# Altium PCB MB_v3.PcbDoc (part 8 of 11)
Units mm, origin at the board's own origin, x right, y up, seen from the top; angles counter-clockwise.
Board outline 203 x 72 mm, 6 copper layers (Top Layer, Layer 3, Layer 1, Layer 2, Layer 4, Bottom Layer), stack 1.52 mm thick; 726 components, 608 nets, 3144 pads, 2508 vias.
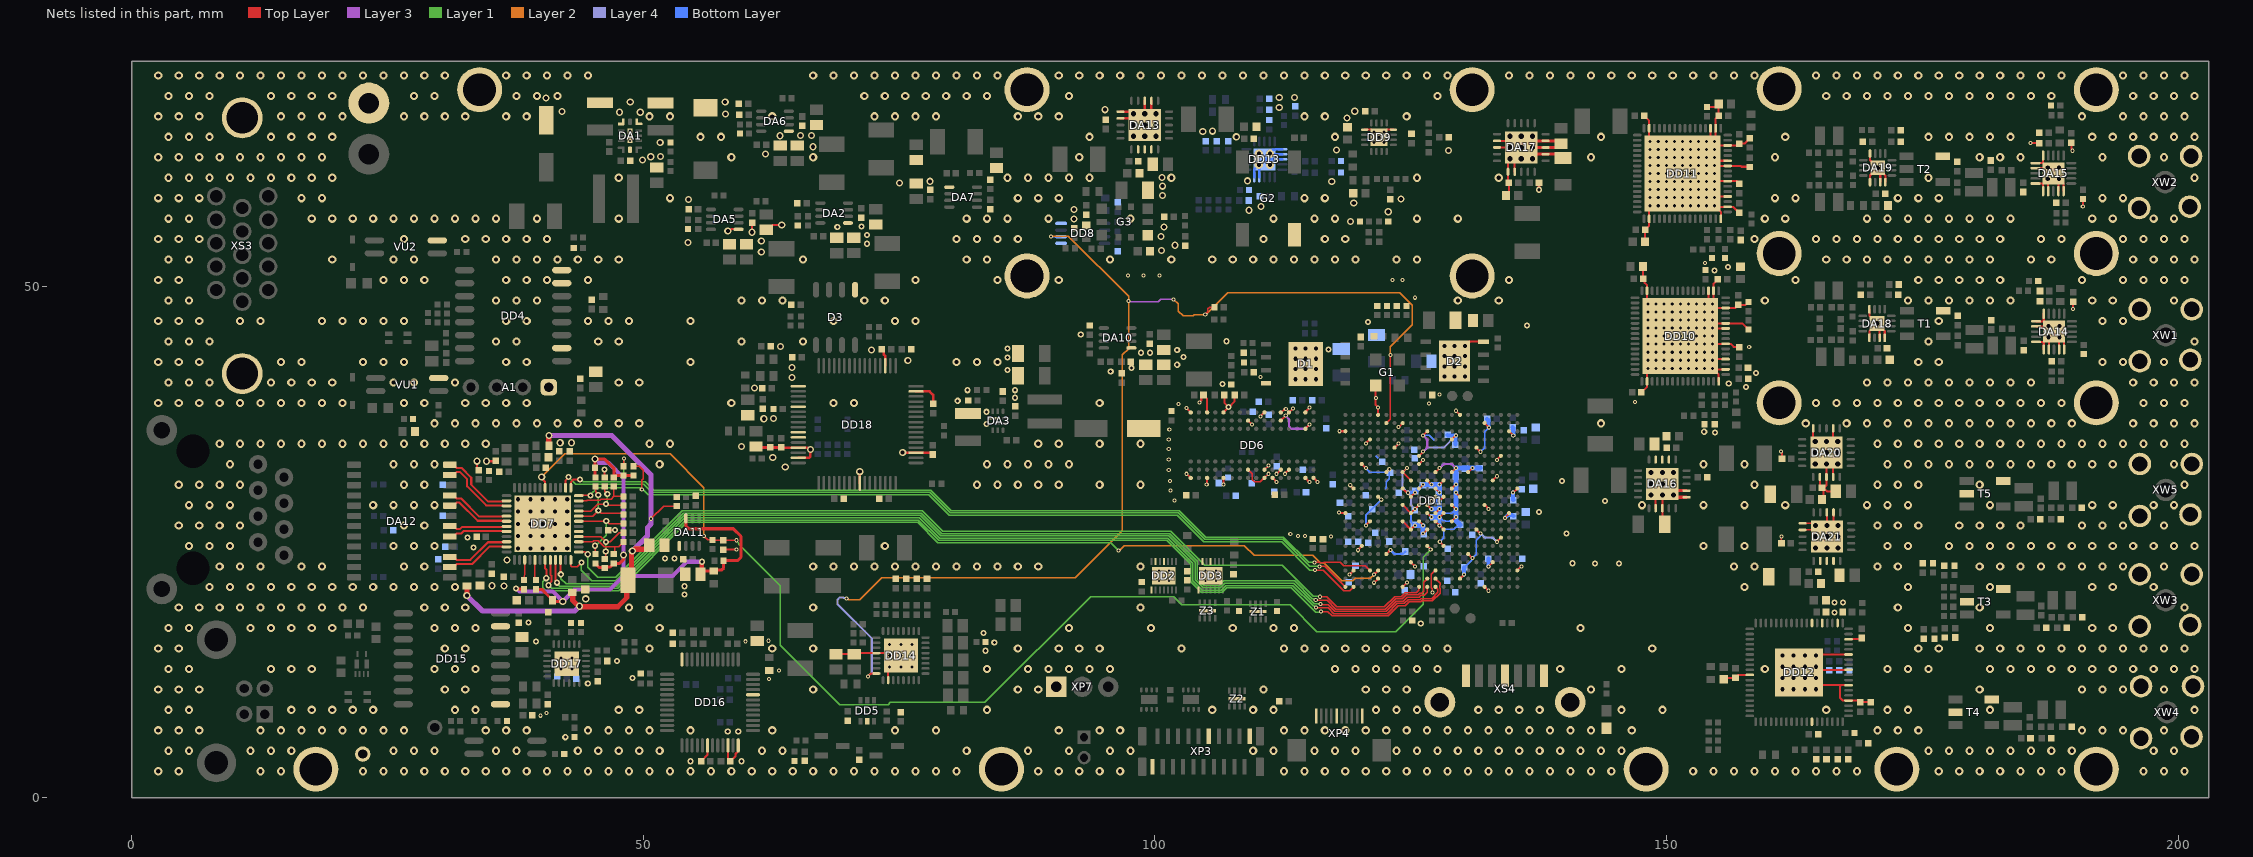
[diagram p10: the nets of this part, all layers, seen from the top]

## Via types
v1: diameter 0.8, hole 0.4, Top Layer to Bottom Layer, tented both sides, 1056 vias
v2: diameter 0.4, hole 0.2, Top Layer to Bottom Layer, tented both sides, 707 vias
v3: diameter 0.6, hole 0.3, Top Layer to Bottom Layer, tented both sides, 364 vias
v4: diameter 0.7, hole 0.4, Top Layer to Bottom Layer, tented both sides, 223 vias
v5: diameter 0.8, hole 0.4, Top Layer to Bottom Layer, 52 vias
v6: diameter 0.9, hole 0.5, Top Layer to Bottom Layer, 45 vias
v7: diameter 0.66, hole 0.4, Top Layer to Bottom Layer, 25 vias
v8: diameter 0.7, hole 0.3, Top Layer to Bottom Layer, 13 vias
v9: diameter 0.5, hole 0.2, Top Layer to Bottom Layer, 12 vias
v10: diameter 0.5, hole 0.3, Top Layer to Bottom Layer, 5 vias
v11: diameter 1, hole 0.5, Top Layer to Bottom Layer, 2 vias
v12: diameter 0.4, hole 0.2, Top Layer to Bottom Layer, 2 vias
v13: diameter 0.9, hole 0.4, Top Layer to Bottom Layer, tented both sides, 2 vias

## Nets (pads, with @x,y where several pads share a name; then routed paths per layer and width w, separated by ;. In a path a pad name is that pad's centre, name@x,y a point inside that pad or via, vN(x,y) a via of type N, cw(c..) or ccw(c..) an arc to the next point about the centre after c; other vN are vias at no path point) (continued)
ETH0_1V2: C131.2 L16.2 L19.1 L20.1 L21.1 R63.2 | length 50
  Top Layer w0.125: v2(50.75,27.275) 51.981,28.506 R63.2@53.271,28.506
  Top Layer w0.5: v4(32.75,19.775) 32.758,19.783 32.758,20.698 L20.1@32.766,20.706 ; L21.1@40.762,34.417 40.762,35.387 v4(40.775,35.4) ; L19.1@43.053,20.071 43.104,20.02 43.104,19.296 43.725,18.675 47.5,18.675 48.385,19.56 48.385,21.155 48.848,21.618 48.848,23.994 48.925,24.071 v4(48.925,24.125) 48.979,24.125 49.15,24.296 50.32,24.296 50.57,24.546 C131.2@50.57,24.696
  Layer 3 w0.5: v4(32.75,19.775) 34.275,18.25 43.3,18.25 v4(43.773,18.723) ; v4(40.775,35.4) 46.925,35.4 50.75,31.575 v2(50.75,27.275) 50.75,26.753 50.4,26.403 50.4,25.6 v4(48.925,24.125)
ETH0_3V3: C146.2 DA11.7 L17.2 L18.1 R62.2 R71.2 R72.2 R73.2 R74.2 R75.2 R77.2 R78.2 R79.2 R81.1 R83.1 | length 63.1
  Top Layer w0.3: v3(37.55,20.45) 37.586,20.414 38.318,20.414 R83.1@38.354,20.378 ; R81.1@39.497,20.378 39.499,20.376 40.071,20.376 40.873,19.574 40.948,19.574 41.143,19.379 L18.1@41.143,19.304 41.247,19.2 v4(42.125,19.2) ; R72.2@45.339,22.918 45.325,22.904 45.325,22.825 45.432,22.825 45.489,22.768 45.489,22.702 45.665,22.526 46.149,22.526 R73.2@46.225,22.45 46.331,22.556 46.755,22.556 R74.2@47.117,22.918 47.693,22.918 48.05,23.275 v4(48.05,23.725) ; R71.2@45.339,31.311 45.281,31.369 R77.2@45.281,32.258 45.278,32.261 45.278,33.097 v4(45.275,33.1) 46.225,33.1 47.117,32.208 R75.2@47.117,31.311 47.306,31.5 R78.2@48.075,31.5 R79.2@49.025,31.5 ; DA11.7@54.158,27.316 54.158,26.567 54.425,26.3 58.8,26.3 59.55,25.55 59.55,23.525 59.2,23.175 R62.2@57.85,23.175 57.85,22.451 57.674,22.275 56.97,22.275 L17.2@56.875,22.18 55.93,22.18 55.712,21.962 C146.2@55.6,21.85
  Top Layer w0.4: C146.2@55.6,21.85 55.712,21.962 55.712,23.037 v3(55.75,23.075)
  Layer 3 w0.4: v3(37.55,20.45) 37.604,20.45 37.881,20.173 41.152,20.173 v4(42.125,19.2) 43.275,20.35 46.727,20.35 48.05,21.673 ; v4(45.275,33.1) 45.309,33.1 45.659,32.75 46.575,32.75 48.05,31.275 v4(48.05,23.725) 48.05,21.673 ; v3(55.75,23.075) 54.275,23.075 52.873,21.673 48.05,21.673
ETH0_LEDGRN: DD7.17 R81.2 | length 2
  Top Layer w0.125: DD7.17@39.413,23.252 39.413,21.362 R81.2@39.497,21.278
ETH0_LEDYEL: DD7.15 R83.2 | length 2
  Top Layer w0.125: R83.2@38.354,21.278 38.354,21.728 38.413,21.787 DD7.15@38.413,23.252
ETH0_TD0_N: DA12.11 DD7.3 | length 7.5
  Top Layer w0.2: DA12.11@31.091,31.551 31.466,31.551 31.766,31.851 32.066,31.851 32.783,31.134 32.783,30.444 34.65,28.577 36.236,28.577 36.286,28.527 DD7.3@36.638,28.527
ETH0_TD0_P: DA12.12 DD7.2 | length 7.5
  Top Layer w0.2: DA12.12@31.091,32.551 31.466,32.551 31.766,32.251 32.232,32.251 33.183,31.3 33.183,30.61 34.816,28.977 36.236,28.977 36.286,29.027 DD7.2@36.638,29.027
ETH0_TD1_N: DA12.8 DD7.6 | length 6.4
  Top Layer w0.2: DA12.8@31.091,28.551 31.466,28.551 31.766,28.851 32.04,28.851 33.814,27.077 36.236,27.077 36.286,27.027 DD7.6@36.638,27.027
ETH0_TD1_P: DA12.9 DD7.5 | length 6.4
  Top Layer w0.2: DA12.9@31.091,29.551 31.466,29.551 31.766,29.251 32.206,29.251 33.98,27.477 36.236,27.477 36.286,27.527 DD7.5@36.638,27.527
ETH0_TD2_N: DA12.5 DD7.8 | length 5.8
  Top Layer w0.2: DA12.5@31.091,25.551 31.466,25.551 31.766,25.851 32.232,25.851 32.458,26.077 35.181,26.077 36.236,26.077 36.286,26.027 DD7.8@36.638,26.027
ETH0_TD2_P: DA12.6 DD7.7 | length 5.8
  Top Layer w0.2: DA12.6@31.091,26.551 31.466,26.551 31.766,26.251 32.066,26.251 32.292,26.477 35.347,26.477 36.236,26.477 36.286,26.527 DD7.7@36.638,26.527
ETH0_TD3_N: DA12.2 DD7.11 | length 6.4
  Top Layer w0.2: DA12.2@31.091,22.551 31.466,22.551 31.766,22.851 33.265,22.851 34.991,24.577 36.236,24.577 36.286,24.527 DD7.11@36.638,24.527
ETH0_TD3_P: DA12.3 DD7.10 | length 6.4
  Top Layer w0.2: DA12.3@31.091,23.551 31.466,23.551 31.766,23.251 33.099,23.251 34.825,24.977 36.236,24.977 36.286,25.027 DD7.10@36.638,25.027
ETH_INT: DD1.AB1 DD7.38 | length 81.6
  Top Layer w0.125: v2(116.1,22.625) 116.612,22.625 DD1.AB1@118.612,20.625
  Top Layer w0.2: DD7.38@42.413,30.302 42.413,31.029 42.672,31.288 v3(42.672,31.369)
  Layer 1 w0.125: v3(42.672,31.369) 43.389,30.652 50.023,30.652 50.825,29.85 78.007,29.85 80.007,27.85 102.282,27.85 104.869,25.263 112.469,25.263 115.107,22.625 v2(116.1,22.625)
ETH_MDC: DD1.AB2 DD7.36 R79.1 | length 83.6
  Top Layer w0.125: DD7.36@43.688,29.527 43.72,29.559 44.822,29.559 v3(44.831,29.55) ; R79.1@49.025,32.4 49.6,32.4 50,32 50,31.175 49.85,31.025 v2(49.85,30.125) ; v2(115.65,22.262) 116.442,22.262 118.455,20.25 119.037,20.25 DD1.AB2@119.412,20.625
  Layer 1 w0.125: v3(44.831,29.55) 44.831,29.63 45.526,30.325 49.789,30.325 v2@49.92,30.195 ; v2(49.85,30.125) v2@49.92,30.195 ; v2(115.65,22.262) 115.151,22.262 112.376,25.038 104.776,25.038 102.189,27.625 79.914,27.625 77.914,29.625 50.489,29.625 v2@49.92,30.195
ETH_MDIO: DD1.Y4 DD7.37 R78.1 | length 85.5
  Top Layer w0.125: R78.1@48.075,32.4 48.075,33.125 v2(48.1,33.15) ; v2(115.575,23) 116.108,23 116.121,22.988 116.25,22.988 116.255,22.983 116.512,22.983 116.529,23 118.124,23 118.462,22.662 120.575,22.662 DD1.Y4@121.012,22.225
  Top Layer w0.2: DD7.37@42.913,30.302 42.921,30.31 42.921,30.856 43.18,31.115 v3(43.815,31.115)
  Layer 1 w0.125: v3(43.815,31.115) 43.911,31.115 44.126,30.9 48.1,30.9 ; v2(48.1,33.15) 48.1,30.9 ; v2(115.575,23) 115.05,23 112.562,25.488 104.962,25.488 102.375,28.075 80.1,28.075 78.1,30.075 51,30.075 50.175,30.9 48.1,30.9
ETH_RST: C155.2 DD1.U11 DD7.42 R70.1 | length 117.8
  Top Layer w0.125: v2(55.925,25.575) 56.285,25.215 R70.1@56.769,25.215 56.824,25.16 C155.2@57.825,25.16 59.085,25.16 v2(59.1,25.175)
  Top Layer w0.2: v4(40.069,31.369) 40.069,31.234 40.394,30.909 40.394,30.321 DD7.42@40.413,30.302 ; DD1.U11@126.612,24.625 126.612,24.619 126.95,24.281 v2(126.95,24.275)
  Layer 1 w0.125: v2(59.1,25.175) 59.1,25.113 59.343,24.87 59.343,24.782 63.375,20.75 63.375,14.925 69.195,9.105 73.915,9.105 74.135,9.325 83.389,9.325 93.726,19.663 101.838,19.663 102.624,18.876 113.205,18.876 115.827,16.253 123.553,16.253 126.22,18.92 126.22,23.509 126.95,24.238 v2(126.95,24.275)
  Layer 2 w0.125: v4(40.069,31.369) 42.312,33.613 52.637,33.613 55.925,30.325 v2(55.925,25.575)
ETH_RXC: DD7.35 R60.1 R75.1 | length 5.5
  Top Layer w0.125: DD7.35@43.688,29.027 44.467,29.027 44.502,29.063 45.754,29.063 45.881,29.19 46.843,29.19 47.117,29.464 ; R75.1@47.117,30.411 47.117,29.464 ; R60.1@48.064,29.464 47.117,29.464
ETH_RXCTL: DD7.33 R65.1 R76.1 | length 6.6
  Top Layer w0.125: DD7.33@43.688,28.027 44.864,28.027 45.539,28.702 46.484,28.702 46.611,28.575 R65.1@48.064,28.575 ; R76.1@46.228,30.411 46.228,29.97 46.482,29.716 v3(46.482,29.677)
  Layer 1 w0.125: v3(46.355,28.702) 46.355,28.831 46.482,28.958 v3(46.482,29.677)
ETH_RXD0: DD7.32 R66.2 R71.1 | length 7.2
  Top Layer w0.125: DD7.32@43.688,27.527 45.039,27.527 45.588,28.076 v3(45.602,28.076) ; R71.1@45.339,30.411 45.339,29.902 45.593,29.648 v3(45.593,29.591) ; v3@45.579,28.067 45.65,28.067 45.904,27.813 47.937,27.813 R66.2@48.064,27.686
  Layer 1 w0.125: v3(45.593,29.591) 45.597,29.587 45.597,28.08 v3(45.602,28.076)
ETH_RXD1: DD7.31 R67.2 R72.1 | length 8.2
  Top Layer w0.125: DD7.31@43.688,27.027 46.352,27.027 v3(46.375,27.05) 46.433,27.05 46.686,26.797 R67.2@48.064,26.797 ; v3(45.289,24.634) 45.289,23.868 R72.1@45.339,23.818
  Layer 1 w0.125: v3(45.289,24.634) 45.335,24.634 46.375,25.674 v3(46.375,27.05)
ETH_RXD2: DD7.28 R68.1 R73.1 | length 6.5
  Top Layer w0.125: DD7.28@43.688,25.527 45.856,25.527 v3(46.369,25.014) 46.389,25.034 46.784,25.034 47.65,25.9 48.056,25.9 R68.1@48.064,25.908 ; R73.1@46.228,23.564 46.304,23.564 46.328,23.587 v3(46.328,24.089)
  Layer 1 w0.125: v3(46.328,24.089) 46.348,24.11 46.348,24.993 v3(46.369,25.014)
ETH_RXD3: DD7.27 R69.1 R74.1 | length 5.6
  Top Layer w0.125: DD7.27@43.688,25.027 45.039,25.027 45.137,25.126 45.604,25.126 46.178,24.552 47.227,24.552 ; R74.1@47.117,23.818 47.227,23.928 47.227,24.552 ; R69.1@48.064,25.019 47.597,24.552 47.227,24.552
ETH_TXC: DD1.AA11 DD7.24 | length 95.3
  Top Layer w0.125: DD7.24@42.913,23.252 42.913,22.679 42.986,22.606 43.561,22.606 v3(43.942,22.987) ; v2(115.712,19.342) 115.765,19.289 116.829,19.289 117.668,18.45 122.51,18.45 123.51,19.45 124.186,19.45 124.561,19.825 125.714,19.825 125.901,20.012 126.062,20.012 126.249,20.199 126.249,21.062 DD1.AA11@126.612,21.425
  Layer 1 w0.125: v3(43.942,22.987) 43.942,22.258 44.975,21.225 47.284,21.225 53.884,27.825 77.168,27.825 79.168,25.825 101.443,25.825 104.15,23.118 104.15,21.411 104.811,20.75 106.277,20.75 106.727,21.2 113.66,21.2 115.38,19.479 115.5,19.479 115.638,19.342 v2(115.712,19.342)
ETH_TXCTL: DD1.AB10 DD7.25 | length 91.4
  Top Layer w0.125: DD7.25@43.688,24.027 44.279,24.027 44.503,23.804 v3(44.572,23.804) ; v2(116.135,19.652) 116.146,19.64 116.796,19.64 117.761,18.675 122.417,18.675 123.417,19.675 124.093,19.675 124.468,20.05 125.525,20.05 125.759,20.284 125.759,20.572 DD1.AB10@125.812,20.625
  Layer 1 w0.125: v3(44.572,23.804) 44.572,22.553 45.55,21.575 47.316,21.575 53.791,28.05 77.261,28.05 79.261,26.05 101.536,26.05 104.862,22.724 112.454,22.724 115.473,19.704 115.862,19.704 115.876,19.691 116.095,19.691 v2(116.135,19.652)
ETH_TXD0: DD1.Y5 DD7.19 | length 90.6
  Top Layer w0.2: DD7.19@40.413,23.252 40.413,22.432 40.53,22.315 40.53,21.48 v3(40.513,21.463) ; v2(121.411,21.824) DD1.Y5@121.812,22.225
  Layer 1 w0.125: v3(40.513,21.463) 40.15,21.1 40.15,20.55 40.45,20.25 47.582,20.25 54.257,26.925 76.795,26.925 78.795,24.925 95.685,24.925 v2(96.441,24.169)
  Layer 2 w0.125: v2(96.441,24.169) 96.515,24.169 96.996,24.65 108.739,24.65 109.69,23.699 115.426,23.699 116.137,22.988 116.513,22.988 118.264,21.236 119.351,21.236 119.565,21.45 121.037,21.45 v2(121.411,21.824)
ETH_TXD1: DD1.AA12 DD7.20 | length 100.5
  Top Layer w0.125: v2(116.227,18.201) 116.899,18.201 117.325,17.775 122.789,17.775 123.789,18.775 124.466,18.775 124.841,19.15 125.993,19.15 126.093,19.25 127.121,19.25 127.861,19.991 127.861,20.482 127.85,20.494 127.85,20.775 127.861,20.787 127.861,20.976 DD1.AA12@127.412,21.425
  Top Layer w0.2: v3(40.746,20.773) 40.746,20.881 41.038,21.173 41.038,21.68 40.913,21.805 DD7.20@40.913,23.252
  Layer 1 w0.125: v3(40.746,20.773) 41.044,20.475 47.489,20.475 54.164,27.15 76.888,27.15 78.888,25.15 101.163,25.15 103.475,22.838 103.475,21.131 104.531,20.075 106.557,20.075 107.007,20.525 113.329,20.525 115.706,18.148 115.902,18.148 116.175,18.148 v2(116.227,18.201)
ETH_TXD2: DD1.AB12 DD7.21 | length 98
  Top Layer w0.125: v2(115.75,18.617) 115.803,18.564 115.96,18.564 115.961,18.563 116.919,18.563 117.482,18 122.696,18 123.696,19 124.372,19 124.747,19.375 125.9,19.375 126,19.475 127.028,19.475 127.636,20.084 127.636,20.401 DD1.AB12@127.412,20.625
  Top Layer w0.2: DD7.21@41.413,23.252 41.413,21.243 41.552,21.103 v3(41.552,21.026)
  Layer 1 w0.125: v3(41.552,21.026) 41.552,20.995 41.847,20.7 47.396,20.7 54.071,27.375 76.982,27.375 78.982,25.375 101.257,25.375 103.7,22.932 103.7,21.224 104.624,20.3 106.464,20.3 106.914,20.75 113.473,20.75 115.469,18.754 115.539,18.754 115.677,18.617 v2(115.75,18.617)
ETH_TXD3: DD1.AB11 DD7.22 | length 96
  Top Layer w0.125: v2(116.183,18.926) 116.234,18.875 116.925,18.875 117.575,18.225 122.603,18.225 123.603,19.225 124.279,19.225 124.654,19.6 125.807,19.6 125.994,19.787 126.314,19.787 126.612,20.085 DD1.AB11@126.612,20.625
  Top Layer w0.2: DD7.22@41.913,23.252 41.913,21.869 v3(41.938,21.844)
  Layer 1 w0.125: v3(41.938,21.844) 41.945,21.837 41.945,21.43 42.45,20.925 47.302,20.925 53.977,27.6 77.075,27.6 79.075,25.6 101.35,25.6 103.925,23.025 103.925,21.317 104.717,20.525 106.37,20.525 106.82,20.975 113.567,20.975 115.562,18.979 115.9,18.979 115.901,18.978 116.13,18.978 v2(116.183,18.926)
GND: A1.1 C1.1 C2.2 C3.1 C4.1 C5.2 C6.1 C7.1 C8.1 C9.1 C10.1 C11.1 C12.1 C15.1 C16.1 C17.1 C18.1 C19.1 C21.1 C22.1 C23.1 C25.2 C26.2 C30.1 C32.1 C33.1 C34.1 C35.1 C36.1 C37.2 C38.1 C39.1 C40.1 C41.1 C42.1 C43.1 C44.1 C45.1 C46.1 C47.1 C48.1 C49.1 C50.1 C51.1 C52.1 C53.1 C54.2 C55.1 C56.1 C57.1 C58.1 C59.1 C60.1 C61.1 C62.1 C63.1 C64.1 C65.1 C66.1 C67.1 C68.1 C69.1 C70.2 C71.1 C72.1 C73.1 C74.1 C75.1 C76.1 C77.1 C78.1 C79.1 C80.1 C81.1 C84.1 C85.1 C86.1 C87.1 C88.1 C89.1 C91.1 C92.1 C93.1 C94.1 C95.1 C96.1 C97.1 C98.1 C99.1 C100.1 C101.1 C102.1 C103.1 C104.1 C105.1 C106.1 C107.1 C108.1 C109.1 C110.1 C111.1 C112.1 C113.1 C114.1 C115.1 C116.1 C117.1 C118.1 C119.1 C120.1 C121.1 C122.2 C123.1 C124.1 C125.1 C126.1 C127.2 C128.1 C129.1 C131.1 C132.1 C133.1 C134.1 C135.1 C136.1 C137.1 C138.1 C139.1 C140.1 C141.1 C142.1 C143.1 C144.1 C145.1 C146.1 C147.1 C148.1 C149.1 C150.1 C151.1 C152.1 C153.1 C154.1 C155.1 C156.1 C157.1 C158.1 C159.1 C160.1 C161.1 C162.1 C163.1 C164.1 C165.1 C166.1 C167.1 C168.1 C169.1 C170.1 C171.1 C172.1 C173.2 C174.1 C175.1 C176.1 C177.1 C178.1 C179.1 C180.1 C181.2 C182.1 C183.1 C184.1 C185.1 C186.1 C187.1 C188.1 C189.1 C191.1 C192.1 C193.1 C194.1 C195.2 C196.1 C197.2 C198.1 C199.1 C200.1 C202.1 C203.1 C204.1 C205.1 C208.1 C209.2 C210.1 C211.1 C212.1 C215.1 C216.1 C217.1 C218.1 C219.1 C220.1 C221.1 C222.1 C223.1 C224.1 C225.1 C226.1 C227.1 C228.1 C229.1 C230.1 C231.1 C232.1 C233.1 C234.1 C235.1 C236.1 C237.1 C242.1 C245.1 C247.1 C251.1 C252.1 C254.1 C255.1 C256.1 C257.1 C258.1 C259.1 C260.1 C261.1 C262.1 C263.1 C264.1 C265.1 C266.1 C267.1 C269.1 C270.1 C271.1 C272.1 C273.1 C274.1 C275.1 C276.1 C277.1 C278.1 C279.1 C280.1 C281.1 C282.1 C283.1 C284.1 C285.1 C286.1 C287.1 C288.1 C289.1 C290.1 C291.1 C292.1 C293.1 C294.1 C295.1 C296.1 C297.2 C298.1 C299.2 C300.2 C301.1 C302.2 C303.1 C305.1 C306.1 C308.1 C309.1 C310.1 C311.1 C314.1 C316.1 C317.1 C320.1 C321.1 C322.1 C323.2 C324.2 C325.1 C326.2 C327.1 C328.1 C329.1 C330.1 C333.1 C335.1 C336.1 C337.2 C338.2 C339.1 C340.1 C343.1 C346.1 C347.2 C348.2 C352.2 C359.1 C360.1 C361.1 C363.1 C364.1 D1.4 D1.9 D2.4 D2.9 D3.5 DA1.1 DA1.6 DA1.11 DA1.13 DA2.1 DA3.4 DA5.1 DA6.1 DA7.1 DA10.1 DA11.1 DA13.7 DA13.8 DA13.11 DA13.12 DA13.17 DA13.18 DA13.19 DA13.21 DA14.10 DA14.11 DA14.12 DA14.15 DA14.16 DA14.17 DA14.19 DA14.20 DA14.21 DA15.10 DA15.11 DA15.12 DA15.15 DA15.16 DA15.17 DA15.19 DA15.20 DA15.21 DA16.7 DA16.8 DA16.11 DA16.12 DA16.17 DA16.18 DA16.19 DA16.21 DA17.7 DA17.8 DA17.11 DA17.12 DA17.17 DA17.18 DA17.19 DA17.21 DA18.4 DA18.9 DA18.11 DA18.12 DA18.17 DA19.4 DA19.9 DA19.11 DA19.12 DA19.17 DA20.7 DA20.10 DA20.17 DA20.18 DA20.19 DA20.21 DA21.7 DA21.8 DA21.11 DA21.12 DA21.17 DA21.18 DA21.19 DA21.21 DD1.A5 DD1.A15 DD1.AA5 DD1.AA15 DD1.AB8 DD1.AB18 DD1.B8 DD1.B18 DD1.C1 DD1.C11 DD1.C21 DD1.D4 DD1.D14 DD1.E7 DD1.E17 DD1.F10 DD1.F20 DD1.G3 DD1.G10 DD1.H6 DD1.H8 DD1.H12 DD1.H14 DD1.H16 DD1.J9 DD1.J11 DD1.J13 DD1.J19 DD1.K2 DD1.K8 DD1.K10 DD1.K12 DD1.K14 DD1.K22 DD1.L5 DD1.L9 DD1.L12 DD1.L13 DD1.L15 DD1.M8 DD1.M10 DD1.M11 DD1.M14 DD1.M18 DD1.N1 DD1.N9 DD1.N11 DD1.N12 DD1.N13 DD1.N21 DD1.P4 DD1.P8 DD1.P10 DD1.P12 DD1.P14 DD1.R9 DD1.R11 DD1.R13 DD1.R17 DD1.T20 DD1.U3 DD1.U13 DD1.V6 DD1.V16 DD1.W9 DD1.W19 DD1.Y2 DD1.Y12 DD1.Y22 DD2.4 DD2.6 DD2.8 DD2.15 DD3.4 DD3.6 DD3.8 DD3.15 DD4.2 DD4.7 DD4.8 DD5.2 DD6.A9 DD6.B1 DD6.B3 DD6.B9 DD6.D1 DD6.D8 DD6.E1 DD6.E2 DD6.E8 DD6.F9 DD6.G1 DD6.G8 DD6.G9 DD6.J2 DD6.J8 DD6.M1 DD6.M9 DD6.P1 DD6.P9 DD6.T1 DD6.T9 DD7.29 DD7.49 DD8.5 DD8.8 DD9.5 DD9.16 DD9.17 DD10.2 DD10.4 DD10.7 DD10.10 DD10.11 DD10.14 DD10.18 DD10.19 DD10.31 DD10.50 DD10.64 DD10.65 DD11.2 DD11.4 DD11.7 DD11.10 DD11.11 DD11.14 DD11.18 DD11.19 DD11.31 DD11.50 DD11.64 DD11.65 DD12.2 DD12.5 DD12.7 DD12.28 DD12.48 DD12.58 DD12.61 DD12.64 DD12.67 DD12.70 DD12.73 DD13.1 DD13.2 DD13.3 DD13.9 DD13.10 DD13.21 DD14.12 DD14.18 DD14.33 DD15.9 DD15.15 DD16.6 DD16.10 DD16.12 DD16.20 DD16.36 DD17.25 DD18.1 DD18.5 DD18.10 DD18.11 DD18.13 DD18.15 DD18.25 DD18.35 DD18.47 DD18.51 G1.2 G2.2 G3.4 HL1.2 L56.1 pad.1 R8.2 R9.2 R11.1 R14.2 R16.2 R18.2 R19.1 R29.1 R30.1 R34.1 R36.1 R45.2 R48.2 R49.2 R51.2 R53.2 R55.2 R57.2 R58.2 R64.2 R76.2 R80.2 R87.2 R94.2 R95.2 R96.1 R97.1 R98.2 R102.2 R104.2 R106.2 R108.2 R113.2 R114.2 R120.2 R122.2 R126.2 R128.2 R129.2 R130.2 R144.2 R146.2 R147.2 R148.2 R149.2 R150.2 R151.1 R155.2 R156.1 R158.1 R159.1 R160.1 R164.1 R166.1 R167.1 R168.1 R174.1 R177.1 R179.1 R183.2 R189.2 R203.1 R205.2 T1.4 T2.4 T3.2 T3.4 T4.2 T4.4 T5.2 T5.4 VU1.2 VU2.2 XP1.2 XP3.1 XP3.12 XP3.20 XP4.1 XP4.5 XP4.10 XP7.1 XS3.16 XS4.1 XS4.4 XS4.7 XW1.2 XW2.2 XW3.2 XW4.2 XW5.2 Z1.9 Z2.9 Z3.9 | length 357.2
  Top Layer w0.125: C177.1@46.561,26.162 v3(47.244,26.162) ; DD6.J8@109.099,32.068 109.497,31.67 109.497,31.108 109.734,30.87 110.301,30.87 DD6.G9@110.699,31.268 ; v2(127.11,20.07) 127.087,20.093 127.087,20.458 127.024,20.52 127.024,21.837 DD1.Y12@127.412,22.225 ; C292.1@161.229,24.892 161.229,25.529 v2(161.25,25.55) ; DA21.12@163.289,26.177 165.014,26.177 v6(165.664,25.527) ; DA21.11@163.289,26.827 164.364,26.827 v6(164.564,26.627)
  Top Layer w0.2: v4(33.75,32.9) 33.759,32.891 33.759,32.185 C166.1@33.909,32.035 ; v4(34.671,32.893) 35.512,32.893 C176.1@35.56,32.941 ; v3(46.2,32.075) 46.2,31.339 R76.2@46.228,31.311 ; C261.1@55.64,3.575 56.04,3.975 56.04,3.978 56.157,4.095 ; 56.158,4.095 56.275,4.212 DD16.6@56.275,5.125 ; C155.1@57.825,24.24 57.86,24.275 v2(59.1,24.275) ; v4(58.257,55.4) 58.392,55.4 58.57,55.578 59.279,55.578 DA5.1@59.308,55.549 ; DD16.10@58.275,5.125 58.275,3.81 C251.1@58.51,3.575 59.013,4.078 59.013,4.286 59.275,4.548 DD16.12@59.275,5.125 ; v4(60.607,55.275) 60.607,56.173 C15.1@60.625,56.191 ; C8.1@62.022,55.52 62.172,55.52 62.627,55.975 v4(63.532,55.975) ; C348.2@68.838,14.035 C347.2@70.616,14.035 70.731,14.15 DD14.12@72.775,14.15 73.825,14.15 v8(74.075,13.9) ; DD14.18@73.925,11.5 73.925,12.65 v8(74.075,12.8) ; v2@103.082,38.09 DD6.T1@103.501,37.671 ; v2(103.098,31.669) DD6.T9@103.499,31.268 ; v2(104.35,38.625) 104.35,38.679 104.525,38.854 104.525,39.15 C124.1@104.745,39.37 105.099,39.016 DD6.P1@105.099,37.668 ; v2(105.059,30.607) 105.097,30.645 DD6.P9@105.097,31.27 ; v2(106.698,30.607) 106.698,31.263 DD6.M9@106.701,31.266 ; DD6.M1@106.699,37.668 107.177,38.146 v3(107.177,38.186) ; C125.1@106.777,39.37 106.777,38.591 107.177,38.191 v3(107.177,38.186) ; v3@107.164,38.186 v3(107.177,38.186) ; v3@107.2,38.15 107.793,38.743 C105.1@107.793,39.37 ; DD6.J2@109.099,36.868 v2(109.5,36.467) ; v2(110.298,37.267) DD6.G1@110.699,37.668 ; DD6.G9@110.701,31.266 v2(111.102,31.667) ; DD6.G8@110.701,32.066 v2(111.102,32.467) ; DD6.F9@111.497,31.266 v2(111.899,30.865) ; v2(111.896,31.669) DD6.E8@112.297,32.07 ; DD6.E2@112.301,36.866 112.301,36.874 112.785,37.357 v2(112.785,37.361) ; DD6.E1@112.301,37.666 112.357,37.666 112.617,37.926 112.729,37.926 v2(112.786,37.984) ; v2(112.696,31.669) DD6.D8@113.097,32.07 ; DD6.D1@113.101,37.666 v2(113.502,38.067) ; DD6.B9@114.697,31.266 v2(115.098,30.865) ; DD6.B3@114.701,36.066 v2(115.102,36.467) ; DD6.B1@114.701,37.666 114.701,37.709 115.102,38.11 v2(115.102,38.149) ; DD6.A9@115.497,31.266 v2(115.899,30.865) ; v2(118.001,27.883) 118.03,27.854 118.587,27.854 DD1.N1@118.614,27.827 ; v2(118.023,35.828) 118.025,35.827 DD1.C1@118.61,35.827 ; v2(119.011,21.824) DD1.Y2@119.412,22.225 ; v2(119.086,30.55) 119.408,30.229 DD1.K2@119.412,30.229 ; v2(119.837,24.199) 119.837,24.224 120.21,24.598 DD1.U3@120.21,24.627 ; DD1.G3@120.21,32.623 v2(120.611,32.222) ; DD9.5@120.496,65.308 121.146,65.308 v10(121.388,65.066) ; v2(120.609,26.626) DD1.P4@121.01,27.027 ; v2(120.609,34.626) DD1.D4@121.01,35.027 ; v2(121.411,21.024) DD1.AA5@121.812,21.425 ; G1.2@121.575,40.305 121.575,38.4 121.799,38.176 v2(121.799,38.15) ; DD1.L5@121.81,29.423 121.821,29.423 122.108,29.136 v2(122.115,29.136) ; DD1.A5@121.812,37.425 v2@121.812,38.137 ; v10(122.404,65.066) 122.646,65.308 DD9.16@123.296,65.308 ; DD1.H6@122.612,31.825 v2(122.901,32.114) ; DD1.V6@122.614,23.823 v2(123.015,24.224) ; DD1.E7@123.412,34.225 v2(123.812,34.626) ; v2(123.811,36.224) DD1.B8@124.212,36.625 ; DD1.AB8@124.212,20.625 v2(124.613,21.026) ; DD1.P8@124.212,27.025 DD1.R9@125.012,26.225 v2(125.413,26.626) ; DD1.M8@124.212,28.625 DD1.N9@125.012,27.825 v2(125.413,28.226) DD1.M10@125.812,28.625 ; DD1.K8@124.212,30.225 124.583,29.854 124.687,29.854 v2(124.725,29.816) ; v2(124.613,32.226) DD1.H8@124.212,31.825 DD1.J9@125.012,31.025 ; DD1.W9@125.012,23.025 v2(125.413,22.624) ; DD1.L9@125.012,29.425 v2(125.413,29.826) ; DD1.P10@125.812,27.025 v2(126.213,26.624) ; DD1.K10@125.812,30.225 v2(126.213,30.626) ; DD1.G10@125.812,32.625 v2(126.213,33.026) ; DD1.F10@125.812,33.425 v2(126.213,33.826) ; v2(126.211,25.824) DD1.R11@126.612,26.225 ; v2(126.211,35.424) DD1.C11@126.612,35.825 ; DD1.N11@126.612,27.825 v2(127.013,27.424) ; DD1.M11@126.612,28.625 v2(127.013,28.224) ; DD1.J11@126.612,31.025 v2(127.013,30.624) ; v2(127.013,29.024) v2(127.013,29.024) 127.412,29.424 DD1.L12@127.412,29.425 ; DD1.P12@127.412,27.025 v2@127.811,26.626 ; DD1.N12@127.412,27.825 v2(127.813,28.226) ; DD1.K12@127.412,30.225 v2(127.813,29.824) ; DD1.H12@127.412,31.825 v2(127.813,32.226) ; v2(127.811,27.424) DD1.N13@128.212,27.825 ; v2(127.811,29.024) DD1.L13@128.212,29.425 ; v2(127.811,30.624) DD1.J13@128.212,31.025 ; v2(127.813,26.624) DD1.R13@128.212,26.225 ; v2(127.837,25.026) 127.837,25.013 128.212,24.638 DD1.U13@128.212,24.625 ; DD1.P14@129.012,27.025 v2(129.413,27.426) ; DD1.M14@129.012,28.625 v2(129.413,28.224) ; DD1.K14@129.012,30.225 v2(129.413,30.626) ; DD1.H14@129.012,31.825 v2(129.413,32.226) ; DD1.D14@129.012,35.025 v2(129.413,35.426) ; v2(129.411,29.826) DD1.L15@129.812,29.425 ; v2(129.411,37.826) DD1.A15@129.812,37.425 ; DD1.AA15@129.812,21.425 v2(130.213,21.826) ; v5(130.283,44.172) 130.683,44.572 130.795,44.572 130.8,44.577 D2.4@132.098,44.577 ; DD1.V16@130.612,23.825 v2(131.013,23.424) ; DD1.H16@130.612,31.825 v2(131.013,32.226) ; DD1.R17@131.412,26.225 v2(131.813,25.824) ; DD1.E17@131.412,34.225 v2(131.813,33.824) ; DD1.AB18@132.212,20.625 132.212,20.619 132.587,20.244 v2(132.587,20.238) ; DD1.M18@132.212,28.625 v2(132.613,28.224) ; DD1.B18@132.212,36.625 132.22,36.625 132.648,36.197 v2(132.655,36.197) ; v2(132.611,22.624) DD1.W19@133.012,23.025 ; DD1.J19@133.012,31.025 v2(133.413,31.426) ; v2(133.411,25.024) DD1.T20@133.812,25.425 ; v2(133.411,33.024) DD1.F20@133.812,33.425 ; DA17.8@133.426,63.556 v6(134.701,63.556) ; DA17.7@133.426,64.206 135.151,64.206 v6(135.801,63.556) ; v2(134.203,27.337) 134.203,27.376 134.612,27.786 DD1.N21@134.612,27.825 ; C221.1@134.312,58.857 134.579,59.124 C223.1@134.579,60.127 134.501,60.205 DA17.11@134.501,61.181 DA17.21@134.501,62.256 ; DD1.C21@134.612,35.825 v2(135.013,35.424) ; DA17.21@134.776,62.456 135.151,62.081 DA17.12@135.151,61.181 ; v2(135.011,29.824) DD1.K22@135.412,30.225 ; DD1.Y22@135.412,22.225 v2(135.813,22.626) ; C267.1@147.544,39.624 148.092,40.172 DD10.50@148.092,40.698 148.092,41.792 148.192,41.892 DD10.65@148.192,41.974 ; C256.1@147.689,51.925 147.71,51.904 C262.1@147.71,50.75 147.85,50.61 147.85,50.325 148.092,50.083 DD10.31@148.092,49.548 148.092,48.454 148.192,48.354 DD10.65@148.192,48.273 ; C269.1@147.798,66.675 148.299,66.174 DD11.31@148.299,65.437 DD11.65@148.299,64.262 ; C259.1@147.9,54.35 C263.1@147.9,55.501 148.299,55.9 DD11.50@148.299,56.587 148.299,57.681 148.399,57.781 DD11.65@148.399,57.862 ; DA16.21@148.558,29.577 148.933,29.202 DA16.7@148.933,28.302 ; v6(149.583,29.577) DA16.8@149.583,28.302 149.583,26.967 C217.1@149.825,26.725 ; DD10.65@152.592,46.373 DD10.11@155.767,46.373 157.411,46.373 R102.2@158.006,45.778 ; DD11.65@152.799,62.262 DD11.11@155.974,62.262 ; DD10.65@153.704,47.485 154.092,47.873 DD10.14@155.767,47.873 156.682,47.873 C264.1@156.99,48.181 157.731,48.181 R104.2@158.006,48.456 ; DD10.65@153.704,48.273 154.092,48.66 DD10.19@154.092,49.548 ; R130.2@153.942,67.506 154.806,67.506 C245.1@155.087,67.787 ; DD11.19@154.299,65.437 154.299,63.762 DD11.14@155.974,63.762 156.95,63.762 C252.1@157.117,63.929 157.133,63.945 157.62,63.945 R108.2@158.133,64.458 ; DD10.65@154.491,42.761 154.572,42.761 154.685,42.873 DD10.4@155.767,42.873 ; DD10.65@154.491,44.336 154.529,44.373 DD10.7@155.767,44.373 155.778,44.362 156.263,44.362 156.55,44.075 157.063,44.075 C266.1@157.117,44.021 ; DD10.65@154.491,45.91 154.529,45.873 DD10.10@155.767,45.873 ; DD10.65@154.491,48.273 154.491,48.354 154.592,48.454 DD10.18@154.592,49.548 154.592,50.259 C260.1@155.006,50.673 ; DD10.65@154.632,41.833 155.092,41.373 DD10.64@155.092,40.698 ; DD10.65@154.673,41.873 DD10.2@155.767,41.873 ; DD11.65@154.699,58.65 154.78,58.65 154.892,58.762 DD11.4@155.974,58.762 ; DD11.65@154.699,60.262 DD11.7@155.974,60.262 156.878,60.262 C265.1@157.117,60.023 ; DD11.65@154.699,61.762 DD11.10@155.974,61.762 157.238,61.762 157.325,61.675 158.111,61.675 R106.2@158.133,61.653 ; DD11.65@154.699,64.162 154.699,64.243 154.799,64.343 DD11.18@154.799,65.437 154.799,66.387 C247.1@155.087,66.675 C245.1@155.087,67.787 ; C245.1@155.1,67.8 C245.1@155.087,67.787 ; DD11.64@155.299,56.587 155.299,57.262 DD11.65@154.699,57.862 154.78,57.862 154.88,57.762 DD11.2@155.974,57.762 156.488,57.762 156.832,57.418 156.897,57.418 C257.1@157.117,57.198 ; C286.1@155.593,11.592 155.733,11.732 C289.1@156.736,11.732 157.013,12.009 DD12.28@158.135,12.009 ; v2(161.2,33.85) 161.2,33.796 161.259,33.737 161.259,33.165 C278.1@161.277,33.147 ; v5(163.51,11.709) 164.21,11.009 167.043,11.009 ; DA20.10@164.326,36.114 164.326,35.039 v6(164.526,34.839) ; DD12.73@164.61,12.509 DD12.64@167.785,12.509 ; v5(164.61,13.909) 164.71,14.009 DD12.67@167.785,14.009 ; DA20.17@164.976,31.364 164.976,30.65 C272.1@165.354,30.272 ; C271.1@165.367,29.129 165.354,29.142 C272.1@165.354,30.272 ; v6(165.626,32.639) DA20.18@165.626,31.364 165.626,30.544 C272.1@165.354,30.272 ; v6(165.626,33.739) 166.276,34.389 DA20.7@166.276,36.114 ; v6(165.664,25.527) 166.314,26.177 DA21.7@166.314,27.902 ; v6(165.664,26.627) DA21.8@165.664,27.902 ; DA20.19@166.276,31.364 166.276,32.264 166.651,32.639 v6(166.726,32.639) ; C280.1@166.625,29.95 C280.1@166.525,29.95 165.676,29.95 C272.1@165.354,30.272 ; DD12.61@167.785,11.009 167.043,11.009 ; DD12.70@167.785,15.509 168.943,15.509 C294.1@169.055,15.621 ; DA18.9@169.821,44.955 169.821,45.605 v11(170.571,46.355) 169.821,47.105 DA18.4@169.821,47.755 ; DA19.9@169.881,60.168 169.881,60.818 v11(170.631,61.568) 169.881,62.318 DA19.4@169.881,62.968 ; C290.1@169.944,9.35 C295.1@168.928,9.35 168.769,9.509 DD12.58@167.785,9.509 167.216,9.509 166.95,9.775 166.95,10.916 167.043,11.009 ; DA18.11@170.821,44.955 170.821,46.105 171.321,45.605 DA18.12@171.321,44.955 ; DA19.11@170.881,60.168 170.881,61.318 171.381,60.818 DA19.12@171.381,60.168 ; v2(185.55,63.975) 186.429,63.975 C199.1@186.439,63.984 ; DA15.15@186.046,60.035 DA15.21@186.796,60.035 ; DA15.12@186.046,61.535 187.196,61.535 v5(187.246,61.585) ; DA15.11@186.046,62.035 186.796,62.035 DA15.10@186.796,62.785 ; DA14.15@186.109,44.565 DA14.21@186.859,44.565 ; DA14.12@186.109,46.065 187.259,46.065 v5(187.309,46.115) ; DA14.11@186.109,46.565 186.859,46.565 DA14.10@186.859,47.315 ; DA15.16@186.796,59.285 DA15.21@186.796,60.035 ; DA14.16@186.859,43.815 DA14.21@186.859,44.565 ; DA15.17@187.296,59.285 187.296,60.435 v5(187.246,60.485) DA15.21@186.821,60.06 ; DA14.17@187.359,43.815 187.359,44.965 v5(187.309,45.015) DA14.21@186.884,44.59 ; DA15.19@188.296,59.285 188.296,60.435 v5(188.346,60.485) 188.796,60.035 DA15.20@188.796,59.285 ; DA14.19@188.359,43.815 188.359,44.965 v5(188.409,45.015) 188.859,44.565 DA14.20@188.859,43.815 ; C189.1@189.566,64.032 189.55,64.017 189.55,63.397 189.658,63.289 v2(189.658,63.235) ; v2(189.722,47.765) 189.722,48.456 C188.1@189.748,48.483 ; v2(190.675,57.8) 190.675,58.49 R97.1@190.709,58.523 ; DA15.21@186.796,60.035 DA15.21@186.821,60.06 ; DA15.21@186.796,60.035 DA15.21@186.821,60.06 ; DA14.21@186.859,44.565 DA14.21@186.884,44.59 ; DA14.21@186.859,44.565 DA14.21@186.884,44.59
  Top Layer w0.25: C337.2@61.02,34.325 61.105,34.24 C333.1@62.425,34.24 C330.1@63.5,34.24 63.515,34.225 DD18.13@65.15,34.225 66.029,34.225 66.204,34.05 v4(66.326,34.05) 66.326,33.371 66.179,33.225 DD18.15@65.15,33.225 ; DD18.25@71.15,30.725 v4(71.15,31.875) ; C340.1@73.29,43.85 73.485,43.655 73.485,43.34 73.65,43.175 DD18.51@73.65,42.225 ; v4@75.375,33.725 DD18.35@76.65,33.725 78.13,33.725 C326.2@78.3,33.555 ; DD18.47@76.65,39.725 77.975,39.725 78.325,39.375 C360.1@78.325,38.51 ; DA13.12@96.628,66.402 97.553,66.402 97.903,66.752 v6(97.903,66.852) 97.703,67.052 DA13.11@96.628,67.052 ; v6(99.003,66.852) DA13.8@99.003,68.127 ; DA13.7@99.653,68.127 99.653,67.202 100.003,66.852 v6(100.103,66.852)
  Top Layer w0.3: v6(135.801,63.556) 136.451,64.206 DA17.19@138.176,64.206 139.394,64.206 C235.1@139.675,63.925 139.525,63.925 139.156,63.556 DA17.18@138.176,63.556 v6(136.901,63.556) ; DA17.21@136.901,62.495 137.312,62.906 DA17.17@138.176,62.906 139.494,62.906 C219.1@139.875,62.525 ; v3(137.525,59.425) 137.528,59.428 137.528,60.124 C231.1@137.531,60.127 ; v6(149.583,30.677) 150.233,30.027 DA16.12@151.958,30.027 ; v6(150.683,29.577) 150.883,29.377 DA16.11@151.958,29.377
  Layer 3 w0.2: v2(112.785,37.361) 112.785,37.307 113.102,36.989 113.102,36.302 113.337,36.067 114.702,36.067 v2(115.102,36.467) ; v2(126.211,35.424) 126.611,35.024 126.611,34.224 v2(126.213,33.826) ; v2(127.813,32.226) 128.213,32.626 129.013,32.626 v2(129.413,32.226)
  Layer 4 w0.2: v2(124.613,32.226) 124.213,31.826 124.213,30.327 v2(124.725,29.816) 124.725,29.761 125.013,29.473 125.013,28.626 v2(125.413,28.226) ; v2(126.213,33.826) 126.613,34.226 128.213,34.226 v2(129.413,35.426) ; v2(127.813,32.226) 128.213,32.626 129.013,32.626 v2(129.413,32.226) ; v2(131.813,25.824) 132.213,25.424 133.011,25.424 v2(133.411,25.024)
  Bottom Layer w0.125: v2(120.611,32.222) 121.013,31.82 122.714,31.82 122.741,31.847 122.741,32.002 122.853,32.114 v2(122.901,32.114) 122.901,31.179 122.603,30.882 122.603,30.301 122.525,30.223 ; 121.569,33.453 121.832,33.19 ; v2(126.211,35.424) 126.796,35.424 127.274,34.946 ; v2(127.811,27.424) 127.813,27.421 128.17,27.064 128.39,27.064 128.436,27.018 128.785,27.018 128.831,27.064 129.051,27.064 v2(129.413,27.426) ; v2(127.813,26.624) 128.21,26.227 ; v2(127.813,28.226) 128.215,27.825 129.015,27.825 v2(129.413,28.224) ; v2(127.813,32.226) 128.216,32.629 129.011,32.629 v2(129.413,32.226) ; v2(127.837,25.026) 128.21,25.399 128.21,26.227 ; C147.1@129.812,26.685 129.561,26.434 129.408,26.434 129.201,26.227 128.21,26.227 ; C139.1@130.225,22.515 130.483,22.773 130.535,22.773 130.961,23.199 130.961,23.371 v2(131.013,23.424) 131.415,23.825 131.415,25.166 131.794,25.545 131.794,25.804 v2(131.813,25.824) 131.869,25.824 132.269,25.424 133.011,25.424 v2(133.411,25.024) ; v2(131.813,33.824) 132.22,34.23 132.22,35.762 v2(132.655,36.197)
  Bottom Layer w0.2: v2(120.609,26.626) 120.609,27.629 v2(122.115,29.136) ; v2(123.015,24.224) 123.413,23.826 123.979,23.826 124.004,23.852 124.262,23.852 C62.1@124.482,24.072 ; v2(125.413,26.626) 125.358,26.626 C56.1@125.318,26.666 125.013,26.971 125.013,27.819 C60.1@125.413,28.219
  Bottom Layer w0.25: DD13.10@109.7,60.65 109.7,61.4 v5(110.15,61.85) ; DD13.9@110.2,60.65 110.2,61.8 v5(110.15,61.85) ; v5(111.25,62.95) 111.3,62.9 DD13.2@112.45,62.9 ; DD13.21@111.45,63.281 111.52,63.35 111.746,63.35 111.796,63.4 DD13.1@112.45,63.4 ; DD13.3@112.45,62.4 DD13.21@110.7,62.4 v5(110.15,61.85)
  Bottom Layer w0.4: v2@124.736,29.826 v2(125.413,29.826) v2(126.213,30.626) ; v2(127.813,26.624) v2@127.813,27.421 ; C69.1@128.61,35.475 128.659,35.426 v2(129.413,35.426) 129.365,35.378 C159.1@129.365,34.525 ; v2(130.213,21.826) 130.213,22.504 C139.1@130.225,22.515 ; C138.1@132.463,37.037 132.583,36.917 132.583,36.269 v2(132.655,36.197) ; C150.1@132.589,23.37 132.589,22.645 v2(132.611,22.624) ; v2(134.203,27.337) 134.51,27.645 134.91,27.645 C152.1@135.024,27.53 ; C142.1@134.95,36.215 135.013,36.151 v2(135.013,35.424) ; v2(135.011,29.824) 135.011,29.124 C157.1@135.035,29.1
  Bottom Layer w0.5: v2(125.413,26.626) 125.416,26.624 v2(126.213,26.624) 126.213,25.826 v2(126.211,25.824) ; v2(126.213,30.626) 126.216,30.624 v2(127.013,30.624) v2(127.811,30.624) 127.813,30.621 v2(127.813,29.824) v2(127.813,28.226) ; v2(127.013,27.424) v2(127.811,27.424) 127.811,28.224 v2(127.813,28.226) ; v2(127.013,28.224) 127.016,28.226 v2(127.813,28.226) ; v2(127.013,29.024) v2(127.811,29.024) ; C147.1@129.812,26.685 129.413,27.084 v2(129.413,27.426) v2(129.413,28.224) v2(129.413,30.626) v2(129.413,32.226) v2(131.013,32.226) 131.75,32.226 C151.1@131.754,32.223
  other v1: 2.6,2.6 4.6,2.6 12.6,2.6 14.6,2.6 22.6,2.6 24.6,2.6 26.6,2.6 28.6,2.6 30.6,2.6 32.6,2.6 34.6,2.6 36.6,2.6 38.6,2.6 40.6,2.6 42.6,2.6 44.6,2.6 46.6,2.6 48.6,2.6 50.6,2.6 52.6,2.6 54.6,2.6 56.6,2.6 58.6,2.6 60.6,2.6 62.6,2.6 64.6,2.6 66.6,2.6 68.6,2.6 70.6,2.6 72.6,2.6 74.6,2.6 76.6,2.6 78.6,2.6 80.6,2.6 88.6,2.6 90.6,2.6 92.6,2.6 94.6,2.6 96.6,2.6 112.6,2.6 114.6,2.6 116.6,2.6 118.6,2.6 120.6,2.6 122.6,2.6 124.6,2.6 126.6,2.6 128.6,2.6 130.6,2.6 132.6,2.6 134.6,2.6 136.6,2.6 138.6,2.6 140.6,2.6 142.6,2.6 144.6,2.6 152.6,2.6 154.6,2.6 156.6,2.6 158.6,2.6 160.6,2.6 162.6,2.6 164.6,2.6 166.6,2.6 168.6,2.6 176.6,2.6 178.6,2.6 180.6,2.6 182.6,2.6 184.6,2.6 186.6,2.6 188.6,2.6 196.6,2.6 198.6,2.6 200.6,2.6 3.6,4.6 5.6,4.6 11.6,4.6 13.6,4.6 15.6,4.6 25.6,4.6 27.6,4.6 29.6,4.6 35.6,4.6 37.6,4.6 43.6,4.6 45.6,4.6 47.6,4.6 49.6,4.6 51.6,4.6 61.6,4.6 63.6,4.6 81.6,4.6 87.6,4.6 91.6,4.6 95.6,4.6 97.6,4.6 109.6,4.6 111.6,4.6 115.6,4.6 117.6,4.6 119.6,4.6 123.6,4.6 125.6,4.6 127.6,4.6 129.6,4.6 131.6,4.6 133.6,4.6 135.6,4.6 137.6,4.6 139.6,4.6 141.6,4.6 143.6,4.6 145.6,4.6 175.6,4.6 177.6,4.6 179.6,4.6 181.6,4.6 183.6,4.6 185.6,4.6 187.6,4.6 189.6,4.6 197.6,4.6 199.6,4.6 2.6,6.6 4.6,6.6 6.6,6.6 12.6,6.6 14.6,6.6 16.6,6.6 18.6,6.6 20.6,6.6 22.6,6.6 24.6,6.6 26.6,6.6 34.6,6.6 36.6,6.6 38.6,6.6 44.6,6.6 46.6,6.6 48.6,6.6 50.6,6.6 54.6,6.6 62.6,6.6 74.6,6.6 78.6,6.6 90.6,6.6 94.6,6.6 96.6,6.6 112.6,6.6 114.6,6.6 116.6,6.6 118.6,6.6 120.6,6.6 122.6,6.6 124.6,6.6 126.6,6.6 128.6,6.6 130.6,6.6 132.6,6.6 134.6,6.6 136.6,6.6 138.6,6.6 140.6,6.6 142.6,6.6 146.6,6.6 170.6,6.6 172.6,6.6 174.6,6.6 190.6,6.6 192.6,6.6 194.6,6.6 198.6,6.6 3.6,8.6 5.6,8.6 15.6,8.6 17.6,8.6 19.6,8.6 21.6,8.6 23.6,8.6 31.6,8.6 33.6,8.6 47.6,8.6 49.6,8.6 83.6,8.6 105.6,8.6 109.6,8.6 111.6,8.6 121.6,8.6 123.6,8.6 125.6,8.6 131.6,8.6 133.6,8.6 135.6,8.6 137.6,8.6 145.6,8.6 149.6,8.6 165.6,8.6 171.6,8.6 173.6,8.6 181.6,8.6 201.6,8.6 2.6,10.6 4.6,10.6 6.6,10.6 30.6,10.6 32.6,10.6 66.6,10.6 86.6,10.6 88.6,10.6 110.6,10.6 120.6,10.6 122.6,10.6 124.6,10.6 142.6,10.6 180.6,10.6 190.6,10.6 192.6,10.6 194.6,10.6 198.6,10.6 3.6,12.6 5.6,12.6 13.6,12.6 15.6,12.6 17.6,12.6 29.6,12.6 31.6,12.6 33.6,12.6 83.6,12.6 87.6,12.6 89.6,12.6 91.6,12.6 93.6,12.6 95.6,12.6 117.6,12.6 119.6,12.6 121.6,12.6 123.6,12.6 125.6,12.6 127.6,12.6 139.6,12.6 145.6,12.6 159.6,12.6 171.6,12.6 173.6,12.6 175.6,12.6 181.6,12.6 183.6,12.6 185.6,12.6 187.6,12.6 189.6,12.6 191.6,12.6 193.6,12.6 195.6,12.6 197.6,12.6 199.6,12.6 201.6,12.6 2.6,14.6 4.6,14.6 30.6,14.6 32.6,14.6 50.6,14.6 62.6,14.6 66.6,14.6 86.6,14.6 90.6,14.6 92.6,14.6 94.6,14.6 102.6,14.6 112.6,14.6 114.6,14.6 116.6,14.6 118.6,14.6 120.6,14.6 122.6,14.6 124.6,14.6 126.6,14.6 128.6,14.6 148.6,14.6 174.6,14.6 176.6,14.6 180.6,14.6 182.6,14.6 184.6,14.6 186.6,14.6 188.6,14.6 190.6,14.6 192.6,14.6 194.6,14.6 196.6,14.6 198.6,14.6 200.6,14.6 3.6,16.6 5.6,16.6 11.6,16.6 13.6,16.6 15.6,16.6 17.6,16.6 19.6,16.6 29.6,16.6 31.6,16.6 33.6,16.6 47.6,16.6 51.6,16.6 91.6,16.6 99.6,16.6 107.6,16.6 111.6,16.6 113.6,16.6 141.6,16.6 173.6,16.6 181.6,16.6 191.6,16.6 193.6,16.6 4.6,18.6 6.6,18.6 8.6,18.6 10.6,18.6 12.6,18.6 14.6,18.6 16.6,18.6 18.6,18.6 20.6,18.6 22.6,18.6 28.6,18.6 30.6,18.6 32.6,18.6 48.6,18.6 50.6,18.6 66.6,18.6 98.6,18.6 172.6,18.6 180.6,18.6 200.6,18.6 7.6,20.6 9.6,20.6 11.6,20.6 13.6,20.6 15.6,20.6 17.6,20.6 19.6,20.6 21.6,20.6 23.6,20.6 25.6,20.6 27.6,20.6 29.6,20.6 31.6,20.6 157.6,20.6 173.6,20.6 181.6,20.6 191.6,20.6 193.6,20.6 197.6,20.6 8.6,22.6 10.6,22.6 12.6,22.6 16.6,22.6 18.6,22.6 26.6,22.6 28.6,22.6 66.6,22.6 68.6,22.6 70.6,22.6 72.6,22.6 74.6,22.6 76.6,22.6 78.6,22.6 80.6,22.6 82.6,22.6 84.6,22.6 86.6,22.6 88.6,22.6 98.6,22.6 156.6,22.6 158.6,22.6 170.6,22.6 172.6,22.6 180.6,22.6 182.6,22.6 184.6,22.6 186.6,22.6 188.6,22.6 190.6,22.6 192.6,22.6 194.6,22.6 198.6,22.6 5.6,24.6 7.6,24.6 9.6,24.6 25.6,24.6 27.6,24.6 29.6,24.6 73.6,24.6 153.6,24.6 157.6,24.6 171.6,24.6 173.6,24.6 177.6,24.6 179.6,24.6 181.6,24.6 183.6,24.6 185.6,24.6 187.6,24.6 189.6,24.6 191.6,24.6 193.6,24.6 195.6,24.6 197.6,24.6 199.6,24.6 201.6,24.6 4.6,26.6 6.6,26.6 8.6,26.6 10.6,26.6 26.6,26.6 28.6,26.6 170.6,26.6 172.6,26.6 174.6,26.6 178.6,26.6 180.6,26.6 182.6,26.6 184.6,26.6 190.6,26.6 192.6,26.6 194.6,26.6 198.6,26.6 5.6,28.6 7.6,28.6 9.6,28.6 23.6,28.6 25.6,28.6 27.6,28.6 29.6,28.6 147.6,28.6 153.6,28.6 157.6,28.6 161.6,28.6 169.6,28.6 171.6,28.6 173.6,28.6 181.6,28.6 191.6,28.6 193.6,28.6 197.6,28.6 199.6,28.6 4.6,30.6 6.6,30.6 8.6,30.6 10.6,30.6 26.6,30.6 28.6,30.6 82.6,30.6 84.6,30.6 86.6,30.6 88.6,30.6 90.6,30.6 94.6,30.6 98.6,30.6 158.6,30.6 170.6,30.6 172.6,30.6 174.6,30.6 180.6,30.6 200.6,30.6 9.6,32.6 25.6,32.6 27.6,32.6 29.6,32.6 51.6,32.6 83.6,32.6 85.6,32.6 87.6,32.6 89.6,32.6 91.6,32.6 153.6,32.6 157.6,32.6 171.6,32.6 173.6,32.6 175.6,32.6 177.6,32.6 179.6,32.6 181.6,32.6 183.6,32.6 185.6,32.6 187.6,32.6 189.6,32.6 191.6,32.6 193.6,32.6 199.6,32.6 8.6,34.6 10.6,34.6 12.6,34.6 14.6,34.6 16.6,34.6 18.6,34.6 20.6,34.6 22.6,34.6 24.6,34.6 26.6,34.6 28.6,34.6 30.6,34.6 32.6,34.6 34.6,34.6 50.6,34.6 52.6,34.6 88.6,34.6 90.6,34.6 94.6,34.6 98.6,34.6 170.6,34.6 172.6,34.6 174.6,34.6 176.6,34.6 178.6,34.6 180.6,34.6 182.6,34.6 184.6,34.6 186.6,34.6 188.6,34.6 190.6,34.6 192.6,34.6 194.6,34.6 196.6,34.6 198.6,34.6 200.6,34.6 29.6,36.6 31.6,36.6 33.6,36.6 35.6,36.6 37.6,36.6 39.6,36.6 41.6,36.6 43.6,36.6 45.6,36.6 47.6,36.6 49.6,36.6 143.6,36.6 163.6,36.6 167.6,36.6 169.6,36.6 171.6,36.6 173.6,36.6 175.6,36.6 177.6,36.6 179.6,36.6 181.6,36.6 183.6,36.6 185.6,36.6 187.6,36.6 189.6,36.6 195.6,36.6 197.6,36.6 199.6,36.6 201.6,36.6 2.6,38.6 4.6,38.6 6.6,38.6 8.6,38.6 10.6,38.6 12.6,38.6 14.6,38.6 16.6,38.6 18.6,38.6 20.6,38.6 26.6,38.6 28.6,38.6 32.6,38.6 34.6,38.6 36.6,38.6 38.6,38.6 58.6,38.6 68.6,38.6 70.6,38.6 94.6,38.6 164.6,38.6 166.6,38.6 168.6,38.6 170.6,38.6 172.6,38.6 174.6,38.6 176.6,38.6 178.6,38.6 180.6,38.6 182.6,38.6 184.6,38.6 186.6,38.6 188.6,38.6 196.6,38.6 198.6,38.6 200.6,38.6 3.6,40.6 5.6,40.6 7.6,40.6 13.6,40.6 15.6,40.6 17.6,40.6 19.6,40.6 25.6,40.6 27.6,40.6 31.6,40.6 47.6,40.6 49.6,40.6 169.6,40.6 171.6,40.6 173.6,40.6 175.6,40.6 177.6,40.6 179.6,40.6 181.6,40.6 183.6,40.6 185.6,40.6 195.6,40.6 197.6,40.6 199.6,40.6 201.6,40.6 2.6,42.6 4.6,42.6 6.6,42.6 14.6,42.6 16.6,42.6 22.6,42.6 24.6,42.6 26.6,42.6 36.6,42.6 38.6,42.6 54.6,42.6 80.6,42.6 82.6,42.6 84.6,42.6 174.6,42.6 176.6,42.6 192.6,42.6 194.6,42.6 198.6,42.6 3.6,44.6 5.6,44.6 7.6,44.6 35.6,44.6 37.6,44.6 45.6,44.6 47.6,44.6 59.6,44.6 65.6,44.6 175.6,44.6 201.6,44.6 2.6,46.6 4.6,46.6 6.6,46.6 10.6,46.6 12.6,46.6 18.6,46.6 20.6,46.6 22.6,46.6 24.6,46.6 26.6,46.6 36.6,46.6 38.6,46.6 44.6,46.6 46.6,46.6 48.6,46.6 54.6,46.6 68.6,46.6 74.6,46.6 76.6,46.6 176.6,46.6 192.6,46.6 194.6,46.6 3.6,48.6 5.6,48.6 35.6,48.6 37.6,48.6 39.6,48.6 59.6,48.6 61.6,48.6 63.6,48.6 71.6,48.6 73.6,48.6 129.6,48.6 133.6,48.6 159.6,48.6 173.6,48.6 175.6,48.6 177.6,48.6 179.6,48.6 181.6,48.6 183.6,48.6 191.6,48.6 193.6,48.6 199.6,48.6 2.6,50.6 4.6,50.6 24.6,50.6 26.6,50.6 28.6,50.6 36.6,50.6 38.6,50.6 40.6,50.6 44.6,50.6 76.6,50.6 84.6,50.6 90.6,50.6 134.6,50.6 162.6,50.6 174.6,50.6 176.6,50.6 178.6,50.6 180.6,50.6 182.6,50.6 190.6,50.6 194.6,50.6 196.6,50.6 198.6,50.6 200.6,50.6 3.6,52.6 5.6,52.6 19.6,52.6 25.6,52.6 27.6,52.6 35.6,52.6 37.6,52.6 39.6,52.6 41.6,52.6 43.6,52.6 45.6,52.6 47.6,52.6 65.6,52.6 81.6,52.6 83.6,52.6 95.6,52.6 101.6,52.6 105.6,52.6 107.6,52.6 109.6,52.6 111.6,52.6 113.6,52.6 115.6,52.6 117.6,52.6 119.6,52.6 123.6,52.6 125.6,52.6 165.6,52.6 167.6,52.6 169.6,52.6 171.6,52.6 173.6,52.6 175.6,52.6 177.6,52.6 179.6,52.6 181.6,52.6 185.6,52.6 187.6,52.6 195.6,52.6 197.6,52.6 199.6,52.6 201.6,52.6 2.6,54.6 4.6,54.6 6.6,54.6 26.6,54.6 32.6,54.6 34.6,54.6 36.6,54.6 38.6,54.6 40.6,54.6 80.6,54.6 82.6,54.6 84.6,54.6 86.6,54.6 110.6,54.6 116.6,54.6 118.6,54.6 158.6,54.6 164.6,54.6 166.6,54.6 168.6,54.6 170.6,54.6 172.6,54.6 174.6,54.6 176.6,54.6 178.6,54.6 180.6,54.6 182.6,54.6 186.6,54.6 188.6,54.6 194.6,54.6 196.6,54.6 198.6,54.6 200.6,54.6 3.6,56.6 5.6,56.6 17.6,56.6 19.6,56.6 21.6,56.6 23.6,56.6 25.6,56.6 27.6,56.6 29.6,56.6 31.6,56.6 33.6,56.6 35.6,56.6 39.6,56.6 47.6,56.6 81.6,56.6 83.6,56.6 85.6,56.6 89.6,56.6 97.6,56.6 111.6,56.6 115.6,56.6 117.6,56.6 125.6,56.6 129.6,56.6 159.6,56.6 161.6,56.6 169.6,56.6 171.6,56.6 173.6,56.6 175.6,56.6 177.6,56.6 179.6,56.6 181.6,56.6 183.6,56.6 191.6,56.6 193.6,56.6 197.6,56.6 199.6,56.6 2.6,58.6 4.6,58.6 6.6,58.6 16.6,58.6 18.6,58.6 52.6,58.6 86.6,58.6 88.6,58.6 90.6,58.6 114.6,58.6 116.6,58.6 160.6,58.6 162.6,58.6 172.6,58.6 174.6,58.6 176.6,58.6 192.6,58.6 194.6,58.6 3.6,60.6 5.6,60.6 7.6,60.6 9.6,60.6 11.6,60.6 13.6,60.6 15.6,60.6 17.6,60.6 19.6,60.6 47.6,60.6 85.6,60.6 87.6,60.6 89.6,60.6 91.6,60.6 93.6,60.6 101.6,60.6 125.6,60.6 133.6,60.6 175.6,60.6 201.6,60.6 2.6,62.6 4.6,62.6 6.6,62.6 8.6,62.6 10.6,62.6 12.6,62.6 14.6,62.6 16.6,62.6 18.6,62.6 58.6,62.6 66.6,62.6 92.6,62.6 142.6,62.6 160.6,62.6 180.6,62.6 182.6,62.6 184.6,62.6 192.6,62.6 198.6,62.6 3.6,64.6 5.6,64.6 7.6,64.6 13.6,64.6 15.6,64.6 17.6,64.6 19.6,64.6 55.6,64.6 57.6,64.6 93.6,64.6 117.6,64.6 143.6,64.6 161.6,64.6 175.6,64.6 177.6,64.6 179.6,64.6 181.6,64.6 183.6,64.6 191.6,64.6 193.6,64.6 195.6,64.6 197.6,64.6 199.6,64.6 201.6,64.6 2.6,66.6 4.6,66.6 6.6,66.6 14.6,66.6 16.6,66.6 18.6,66.6 20.6,66.6 26.6,66.6 28.6,66.6 30.6,66.6 32.6,66.6 36.6,66.6 38.6,66.6 50.6,66.6 52.6,66.6 62.6,66.6 72.6,66.6 74.6,66.6 76.6,66.6 78.6,66.6 86.6,66.6 88.6,66.6 90.6,66.6 114.6,66.6 116.6,66.6 124.6,66.6 190.6,66.6 194.6,66.6 196.6,66.6 198.6,66.6 200.6,66.6 3.6,68.6 5.6,68.6 7.6,68.6 13.6,68.6 15.6,68.6 17.6,68.6 19.6,68.6 27.6,68.6 29.6,68.6 37.6,68.6 39.6,68.6 41.6,68.6 71.6,68.6 73.6,68.6 75.6,68.6 77.6,68.6 79.6,68.6 81.6,68.6 83.6,68.6 91.6,68.6 127.6,68.6 165.6,68.6 167.6,68.6 169.6,68.6 171.6,68.6 173.6,68.6 175.6,68.6 177.6,68.6 179.6,68.6 181.6,68.6 183.6,68.6 185.6,68.6 187.6,68.6 195.6,68.6 197.6,68.6 199.6,68.6 201.6,68.6 2.6,70.6 4.6,70.6 6.6,70.6 8.6,70.6 10.6,70.6 12.6,70.6 14.6,70.6 16.6,70.6 18.6,70.6 20.6,70.6 22.6,70.6 24.6,70.6 26.6,70.6 28.6,70.6 30.6,70.6 36.6,70.6 38.6,70.6 40.6,70.6 42.6,70.6 44.6,70.6 66.6,70.6 68.6,70.6 70.6,70.6 72.6,70.6 74.6,70.6 76.6,70.6 78.6,70.6 80.6,70.6 82.6,70.6 84.6,70.6 90.6,70.6 92.6,70.6 94.6,70.6 96.6,70.6 98.6,70.6 100.6,70.6 102.6,70.6 104.6,70.6 106.6,70.6 108.6,70.6 110.6,70.6 112.6,70.6 114.6,70.6 116.6,70.6 118.6,70.6 120.6,70.6 122.6,70.6 124.6,70.6 126.6,70.6 128.6,70.6 134.6,70.6 136.6,70.6 138.6,70.6 140.6,70.6 142.6,70.6 144.6,70.6 146.6,70.6 148.6,70.6 150.6,70.6 152.6,70.6 154.6,70.6 156.6,70.6 158.6,70.6 164.6,70.6 166.6,70.6 168.6,70.6 170.6,70.6 172.6,70.6 174.6,70.6 176.6,70.6 178.6,70.6 180.6,70.6 182.6,70.6 184.6,70.6 186.6,70.6 188.6,70.6 194.6,70.6 196.6,70.6 198.6,70.6 200.6,70.6
  other v2: 39.95,8.025 40.525,8.3 62.275,11.625 63.275,12.45 60,15.3 62.225,15.35 117.2,25.545 113.975,25.6 114.65,25.6 113.225,25.8 101.9,29.075 101.5,30.05 101.475,30.975 101.35,32.025 101.35,33.05 101.35,34.1 101.35,35.025 101.4,36 103.082,38.094 102.3,38.475 126.8,38.55 146.9,38.675 121.588,39.088 127.813,39.423 110.3,41.125 158.075,44.075 125.4,48.875 123.2,50.625 124.2,50.625 97.35,51.05 98.888,51.05 100.425,51.05 153.75,52.25
  other v3: 54.6,3.575 59.6,3.575 42.375,5.925 58.25,6.475 59.275,6.5 44.575,11.175 48.95,11.7 47.425,13.375 83.425,14.375 84.3,15.175 39.525,15.275 83.25,16.1 125.975,17.025 38.775,17.125 166.4,18.1 166.425,19.1 167.25,19.1 54.028,19.876 54.028,20.676 143,22.9 145.35,22.9 140.8,22.925 52.125,23.375 53.05,23.375 33.4,24.475 32.825,25.45 140.225,25.825 137.525,27.925 143.975,29 139.775,30.95 154.725,35.7 153.675,35.775 83.525,36.55 83.55,37.725 80.725,38.8 86.325,39.1 81.675,39.837 86.325,39.837 157.775,40.15 106.6,40.45 156.075,40.475 158.725,41.512 95.675,41.675 85.575,41.8 97.725,42.025 102.175,42.325 85.575,43.05 102.775,43.075 98.625,43.5 99.5,43.5 102.175,43.775 116.975,43.8 85.575,43.925 107.002,44.623 92.75,45.287 136.35,46.15 120.825,46.488 154.7,51.55 156,51.875 71.857,54.15 71.857,55 68.957,55.775 71.307,55.825
  other v4: 44.375,19.45 36.4,20.7 35.225,20.725 36.689,23.239 63.875,32.325 62.65,33.25 75.349,33.75 59.6,34.325 41.875,34.7 42.975,34.7 61.775,37.05 62.725,37.075 60.875,40.05 64.525,41.075 64.525,42.05 75.85,42.75 72.3,43.775 63.4,44.1 61.532,53.35 100.65,53.475 101.975,54 54.382,54.275 61.532,54.425 100.6,54.85 100.9,55.8 119.1,56.325 92.1,56.583 122.8,57.275 109.175,57.425 92.1,57.508 110.35,57.8 119.425,58.125 54.432,58.475 124.05,58.525 100.75,58.875 100.725,59.775 75.025,60.075 117.275,60.225 78.025,60.25 109.05,60.3 100.7,60.625 49.931,62.325 50.725,62.65 51.675,62.675 61.95,62.925 128.7,63.275 117.75,63.3 66.575,63.625 51.65,64.05 107.95,64.6 63.353,64.7 65.375,64.725 66.425,64.725 104.675,65.125 105.625,65.15 118.775,66.45 58.025,66.825 47.675,67 49.7,67 42.05,67.075 119.525,67.1 95.125,67.25 112.15,67.475 48.725,68 58,68 40.475,68.4 112.15,68.45 113.65,68.45
  other v5: 161.31,10.609 162.41,10.609 163.51,10.609 164.61,10.609 161.31,11.709 162.41,11.709 164.61,11.709 161.31,12.809 162.41,12.809 163.51,12.809 164.61,12.809 161.31,13.909 162.41,13.909 163.51,13.909 113.73,40.91 114.73,40.91 115.73,40.91 128.283,41.172 129.283,41.172 130.283,41.172 113.73,41.91 114.73,41.91 115.73,41.91 128.283,42.172 129.283,42.172 130.283,42.172 113.73,42.91 114.73,42.91 115.73,42.91 128.283,43.172 129.283,43.172 130.283,43.172 113.73,43.91 114.73,43.91 115.73,43.91 128.283,44.172 129.283,44.172 188.409,46.115 188.346,61.585 111.25,61.85 110.15,62.95
  other v6: 164.564,24.427 165.664,24.427 166.764,24.427 164.564,25.527 166.764,25.527 166.764,26.627 148.483,29.577 148.483,30.677 150.683,30.677 148.483,31.777 149.583,31.777 150.683,31.777 164.526,32.639 164.526,33.739 166.726,33.739 165.626,34.839 166.726,34.839 134.701,62.456 135.801,62.456 136.901,62.456 97.903,64.652 99.003,64.652 100.103,64.652 134.701,64.656 135.801,64.656 136.901,64.656 97.903,65.752 99.003,65.752 100.103,65.752
  other v7: 37.763,24.377 38.963,24.377 40.163,24.377 41.363,24.377 42.563,24.377 37.763,25.577 38.963,25.577 40.163,25.577 41.363,25.577 42.563,25.577 37.763,26.777 38.963,26.777 40.163,26.777 41.363,26.777 42.563,26.777 37.763,27.977 38.963,27.977 40.163,27.977 41.363,27.977 42.563,27.977 37.763,29.177 38.963,29.177 40.163,29.177 41.363,29.177 42.563,29.177
  other v8: 41.95,12.575 43.05,12.575 75.175,12.8 76.275,12.8 41.95,13.675 43.05,13.675 75.175,13.9 76.275,13.9 74.075,15 75.175,15 76.275,15
  other v9: 100.375,21.2 101.375,21.2 104.947,21.2 105.947,21.2 100.375,22.2 101.375,22.2 104.947,22.2 105.947,22.2
  other v10: 121.388,64.05 122.404,64.05 121.896,64.558
I2C_SCL_3V3: DD1.B6 DD8.6 DD14.16 R32.2 | length 119.4
  Top Layer w0.125: v2(104.918,47.218) 104.918,47.247 105.178,47.506 105.178,47.79 105.337,47.95 R32.2@105.825,47.95 ; DD1.B6@122.612,36.625 123,37.013 v2(123,43.275)
  Top Layer w0.2: v2(71.95,11.875) 72.225,12.15 DD14.16@72.775,12.15
  Layer 3 w0.125: v2(97.412,48.55) 97.465,48.497 97.65,48.497 97.684,48.462 100.33,48.462 100.573,48.706 101.8,48.706 v2(101.806,48.7)
  Layer 2 w0.125: v2(69.85,19.488) 69.923,19.488 70.061,19.35 71.175,19.35 73.325,21.5 92.214,21.5 96.825,26.111 96.825,43.3 97.425,43.9 97.425,48.462 v2@97.419,48.469 ; v2(89.825,54.875) 91.55,54.875 97.425,49 v2@97.425,48.55 ; v2(97.412,48.55) v2@97.425,48.55 ; v2@97.425,48.475 v2@97.425,48.55 ; v2(101.806,48.7) 101.856,48.7 102.285,48.271 102.285,47.569 102.755,47.099 103.74,47.099 103.859,47.218 v2(104.918,47.218) ; v2@104.918,47.2 104.943,47.2 107.093,49.35 123.943,49.35 125.163,48.131 125.163,46.232 123,44.069 v2(123,43.275)
  Layer 4 w0.2: v2(69.85,19.488) 69.812,19.526 69.602,19.526 69.541,19.587 69.209,19.587 68.975,19.353 68.975,18.93 72.325,15.58 72.325,12.25 v2(71.95,11.875)
  Bottom Layer w0.125: v2(89.825,54.875) 89.867,54.833 DD8.6@90.825,54.833